# Altium PCB A313_5.PcbDoc (part 2 of 4)
Units mm, origin at the board's own origin, x right, y up, seen from the top; angles counter-clockwise.
Board outline 230.01 x 157.01 mm, 2 copper layers (Top Layer, Bottom Layer); 173 components, 153 nets, 1229 pads, 884 vias.
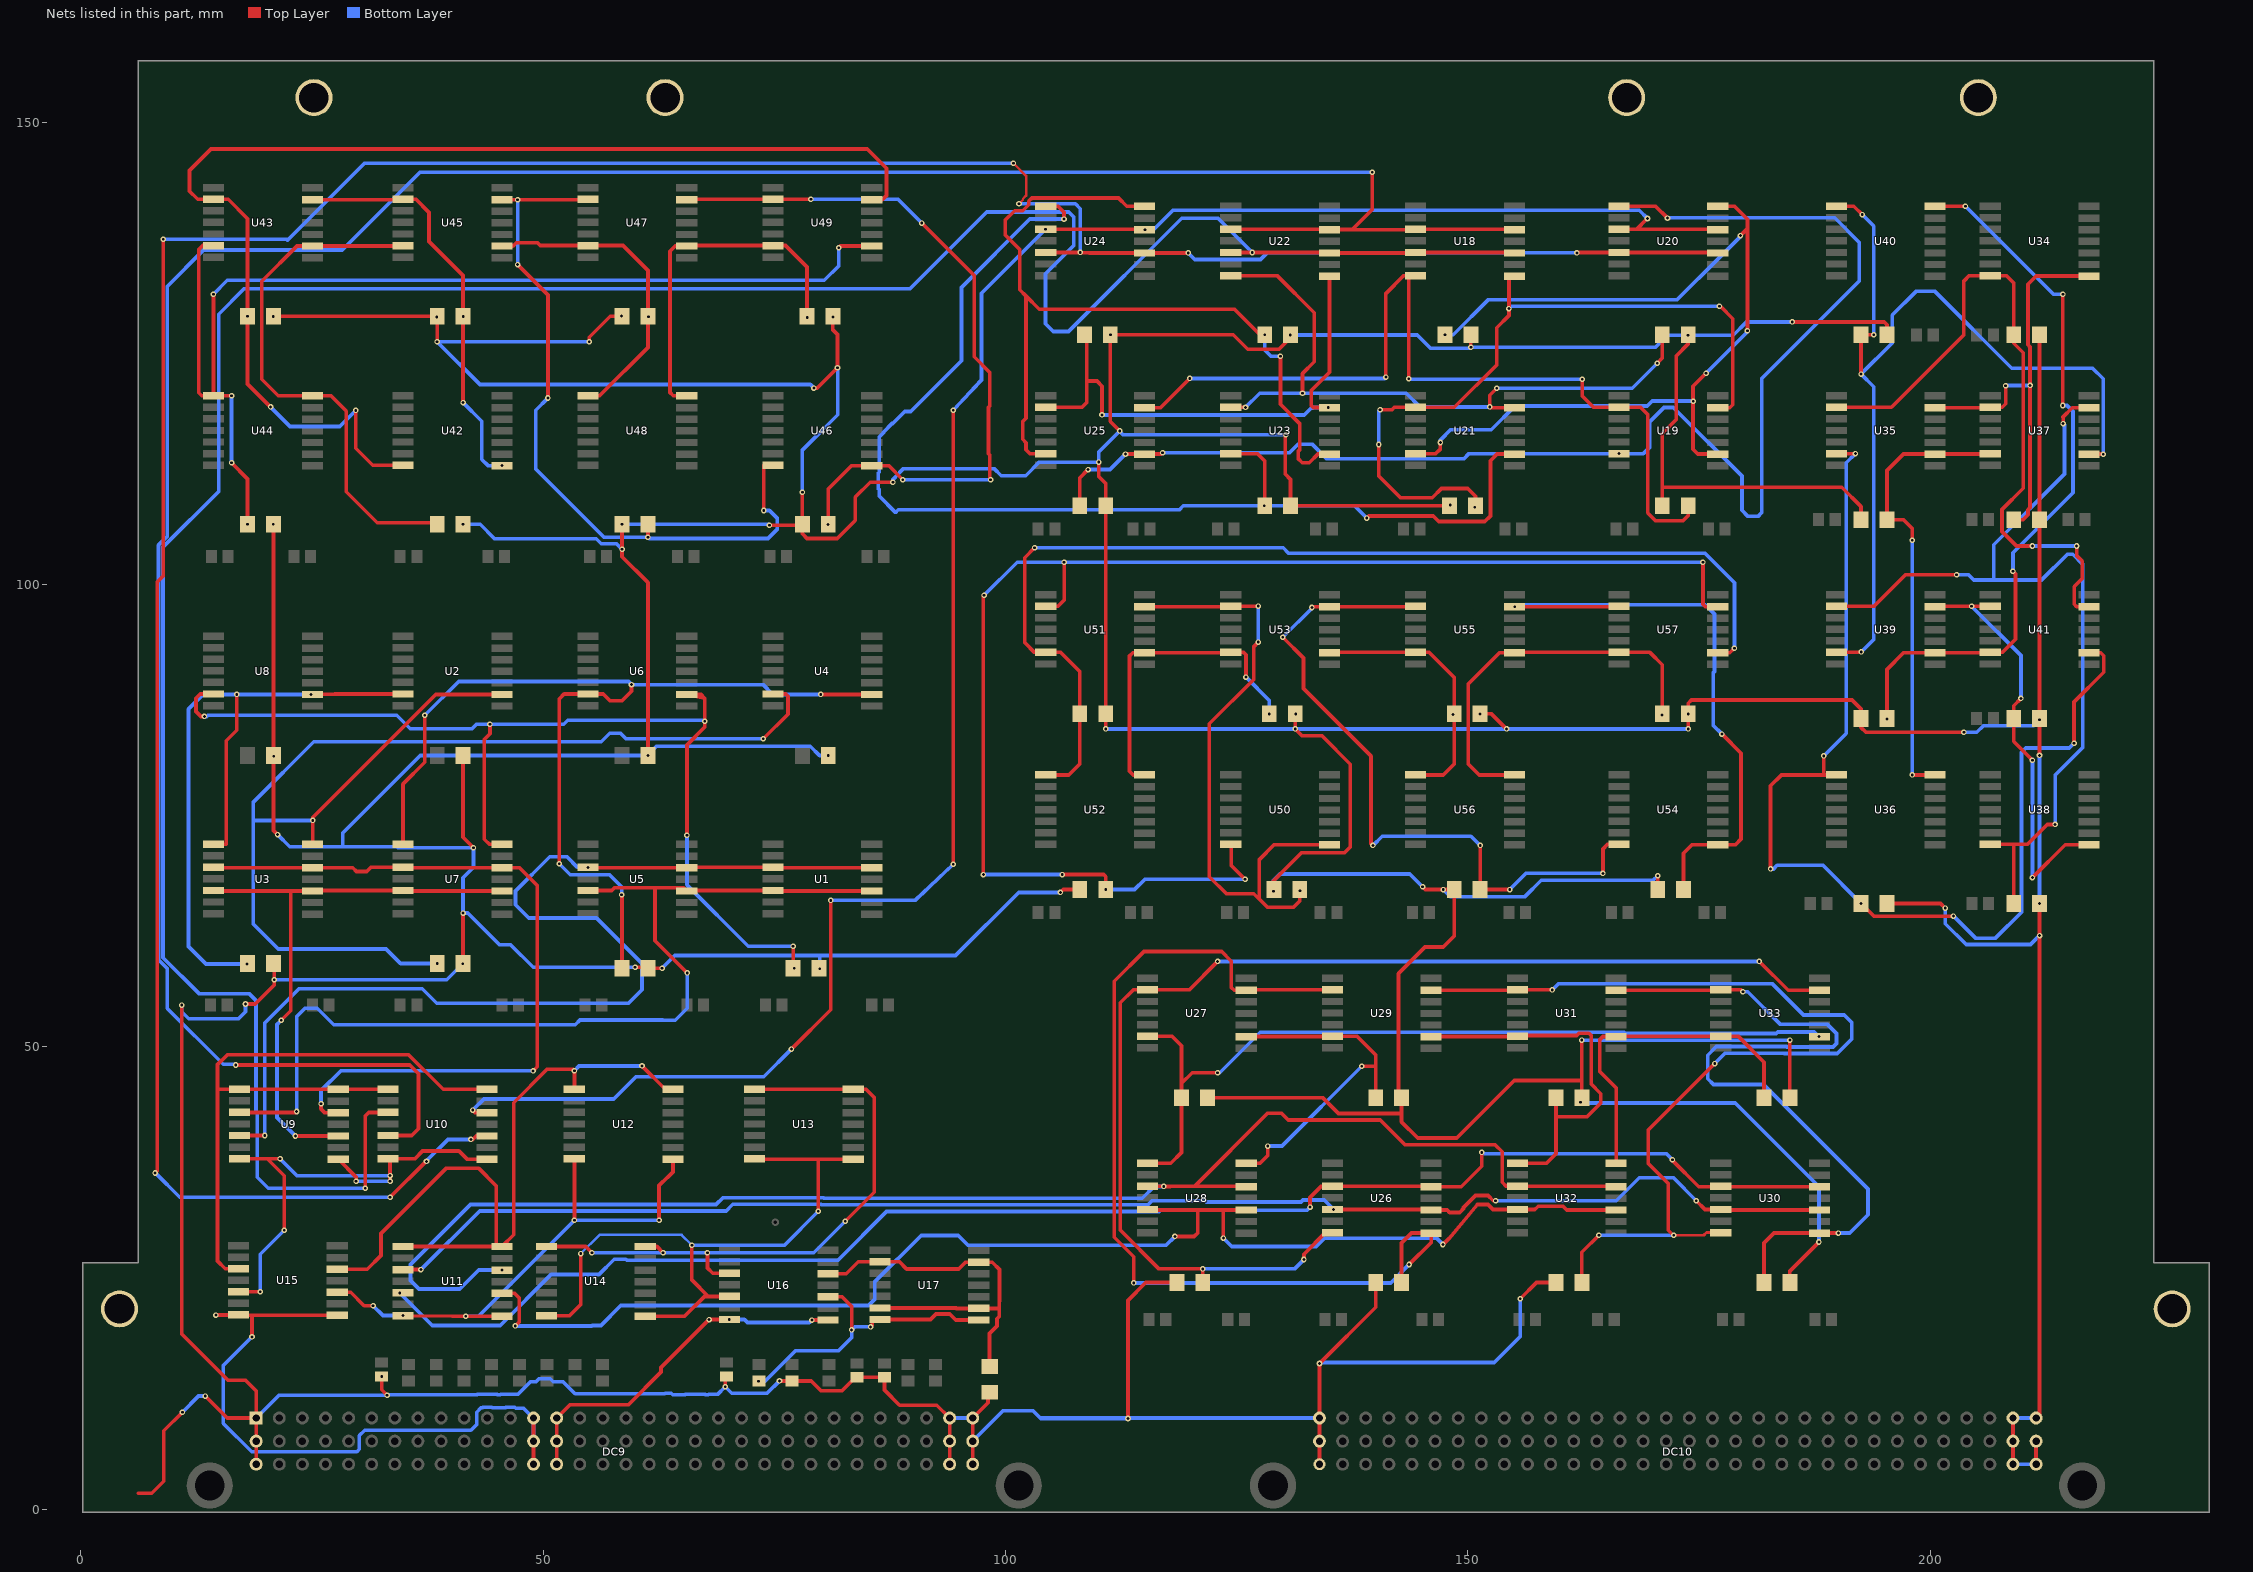
[diagram p2: the nets of this part, all layers, seen from the top]

## Via types
v1: diameter 0.6, hole 0.3, Top Layer to Bottom Layer, 884 vias

## Nets (pads, with @x,y where several pads share a name; then routed paths per layer and width w, separated by ;. In a path a pad name is that pad's centre, name@x,y a point inside that pad or via, vN(x,y) a via of type N, cw(c..) or ccw(c..) an arc to the next point about the centre after c; other vN are vias at no path point) (continued)
NetC5_2: C5.2 U2.6 U3.1 U8.9 | length 74.7
  Top Layer w0.4: U3.1@14.35,71.9 15.706,71.9 15.706,83.097 16.849,84.24 v1(16.849,88.106) ; v1(17.975,58.95) C5.2@18.025,59 ; U8.9@25.025,88.1 25.064,88.139 26.932,88.139 27.466,88.15 U2.6@34.85,88.15
  Bottom Layer w0.4: v1(17.975,58.95) 13.525,58.95 11.625,60.85 11.625,86.514 13.217,88.106 v1(16.849,88.106) v1(24.875,88.106)
NetC6_2: C6.2 U2.9 U3.14 U4.6 | length 136.2
  Top Layer w0.4: U3.14@25.155,71.9 U3.14@25.025,71.9 ; U2.9@45.525,88.1 38.382,88.1 25.075,74.793 v1(25.075,74.475) U3.14@25.075,71.95 ; v1(73.796,83.306) 76.463,85.973 76.463,87.896 76.209,88.15 U4.6@74.85,88.15 ; U3.14@25.025,71.9 U3.14@25.075,71.95 ; U3.14@25.025,71.9 U3.14@25.075,71.95
  Bottom Layer w0.4: v1(25.075,74.475) 18.653,74.475 ; v1(38.525,59) 34.573,59 33,60.573 21.332,60.573 18.653,63.252 18.653,74.475 ; v1(73.796,83.306) 58.946,83.306 58.348,83.904 57.191,83.904 56.279,82.992 25.167,82.992 18.653,76.478 18.653,74.475
NetC7_2: C7.2 U4.9 U6.6 U7.1 | length 109.4
  Top Layer w0.4: U7.1@34.85,71.9 34.832,71.9 34.832,78.404 37.195,80.766 v1(37.195,85.846) ; v1(51.723,69.793) 51.723,87.617 52.257,88.15 56.495,88.15 57.22,87.425 58.525,87.425 59.547,88.447 v1(59.547,89.166) ; v1(58.475,66.45) 58.49,66.45 58.525,66.485 C7.2@58.525,58.5 ; v1(80.003,88.1) U4.9@85.525,88.1
  Bottom Layer w0.4: v1(37.195,85.846) 40.852,89.503 59.209,89.503 v1(59.547,89.166) 73.766,89.166 74.832,88.1 v1(80.003,88.1) ; v1(51.723,69.793) 52.908,68.608 57.176,68.608 58.475,67.309 v1(58.475,66.45)
NetC8_2: C8.2 U6.9 U7.14 U8.6 | length 116.4
  Top Layer w0.4: v1(13.35,85.725) 12.975,85.725 12.45,86.25 12.45,87.7 12.9,88.15 U8.6@14.35,88.15 ; v1(44.23,84.874) 44.23,83.839 43.625,83.234 43.625,72.45 44.175,71.9 U7.14@45.525,71.9 ; v1(65.541,72.866) 65.541,82.645 67.471,84.576 v1(67.471,85.211) 67.471,87.7 ; C8.2@77.025,58.5 v1(77.025,60.878) ; 67.471,87.7 U6.9@65.525,88.1 67.071,88.1 67.471,87.7
  Bottom Layer w0.4: v1(13.35,85.725) 13.579,85.725 13.708,85.854 34.153,85.854 35.615,84.392 42.294,84.392 42.776,84.874 v1(44.23,84.874) 52.227,84.874 52.657,85.304 67.378,85.304 v1(67.471,85.211) ; v1(65.541,72.866) 65.541,67.507 72.17,60.878 v1(77.025,60.878)
  other v1: 77.15,58.5
NetC9_2: C9.2 U18.7 U19.2 U25.13 | length 96.9
  Top Layer w0.4: U25.13@115.025,119.1 116.753,119.1 v1(119.93,122.277) ; v1(141.131,122.422) 141.131,131.47 143.062,133.4 U18.7@143.595,133.4 ; v1(143.595,122.244) U18.7@143.595,133.4 ; U18.7@144.35,133.4 U18.7@143.595,133.4 ; v1(162.366,122.19) 162.366,120.369 163.585,119.15 U19.2@166.35,119.15 168.665,119.15 169.444,118.371 169.444,107.739 170.283,106.9 173.26,106.9 173.825,107.465 C9.2@173.825,108.5
  Bottom Layer w0.4: v1(119.93,122.277) 140.987,122.277 v1(141.131,122.422) ; v1(143.595,122.244) 143.641,122.244 143.695,122.19 v1(162.366,122.19)
NetC10_2: C10.2 U21.13 U22.7 U23.2 | length 76
  Top Layer w0.4: U23.2@124.35,119.15 v1(125.947,119.15) ; U22.7@124.35,133.4 129.367,133.4 133.387,129.38 133.387,124.073 132.114,122.8 v1(132.114,120.68) ; v1(153.12,121.228) 152.358,120.466 v1(152.358,119.196) 152.454,119.1 U21.13@155.025,119.1 ; v1(170.468,123.92) 171.025,124.477 C10.2@171.025,127
  Bottom Layer w0.4: v1(125.947,119.15) 127.477,120.68 v1(132.114,120.68) 143.327,120.68 144.811,119.196 v1(152.358,119.196) ; v1(153.12,121.228) 167.776,121.228 v1(170.468,123.92)
NetC11_2: C11.2 U18.8 U19.13 U21.2 | length 81.8
  Top Layer w0.4: v1(140.369,115.132) 140.369,111.722 142.717,109.374 146.143,109.374 147.151,110.382 149.987,110.382 150.825,109.544 C11.2@150.825,108.5 ; v1(140.5,118.9) 141.791,118.9 142.041,119.15 U21.2@144.35,119.15 148.528,119.15 153.12,123.743 153.12,127.77 154.441,129.091 v1(154.441,129.839) 154.441,133.35 U18.8@155.025,133.35 ; U19.13@177.025,119.1 178.317,119.1 178.647,119.43 178.647,128.746 177.319,130.075 v1(177.2,130.075)
  Bottom Layer w0.4: v1(140.369,115.132) 140.369,118.769 v1(140.5,118.9) ; v1(154.441,129.839) 154.677,130.075 v1(177.2,130.075)
  other v1: 150.75,108.35
NetC12_2: C12.2 U19.6 U20.1 U25.9 | length 151.3
  Top Layer w0.4: C12.2@108.025,108.5 108.025,111.525 v1(108.925,112.425) ; v1(112.971,114.1) 116.849,114.1 v1(116.981,114.232) ; U20.1@166.35,140.9 170.304,140.9 v1(171.586,139.618)
  Bottom Layer w0.4: v1(108.925,112.425) 111.296,112.425 v1(112.971,114.1) ; v1(116.981,114.232) 130.72,114.232 131.663,115.175 133.148,115.175 134.745,113.578 149.54,113.578 150.112,114.15 v1(166.35,114.15) 168.978,114.15 169.681,114.853 169.681,117.613 171.205,119.137 172.221,119.137 179.638,111.72 179.638,108.02 180.298,107.36 181.365,107.36 181.771,107.766 181.771,122.265 192.329,132.822 192.329,136.985 189.665,139.649 171.618,139.649 v1(171.586,139.618)
NetC13_2: C13.2 U22.8 U23.13 U25.2 | length 58.7
  Top Layer w0.4: U25.2@104.35,119.15 108.268,119.15 108.764,119.646 108.764,121.99 ; C13.2@108.525,127 108.764,126.761 108.764,121.99 ; v1(110.429,118.332) 110.429,121.446 109.879,121.996 108.77,121.996 108.764,121.99 ; v1(134.889,119.136) 133.273,119.136 133.075,119.334 133.075,120.995 135.035,122.955 135.035,133.35 U22.8@135.025,133.35
  Bottom Layer w0.4: v1(110.429,118.332) 132.312,118.332 133.13,119.15 133.23,119.05 133.315,119.136 v1(134.889,119.136)
NetC14_2: C14.2 U23.9 U24.14 U25.6 | length 92.2
  Top Layer w0.4: U25.6@104.35,114.15 102.625,114.15 102.215,114.56 102.215,115.327 101.853,115.689 101.853,117.611 102.215,117.973 102.215,131.188 ; U24.14@115.025,140.9 113.115,140.9 112.213,141.802 102.857,141.802 102.51,141.455 102.51,141.06 101.863,140.413 100.982,140.413 99.977,139.408 99.977,137.777 101.525,136.23 101.525,131.878 102.215,131.188 ; v1(128.025,127) 127.517,127 124.755,129.762 103.641,129.762 102.215,131.188 ; v1(129.725,124.675) 129.725,119.477 131.8,117.402 131.8,114.538 131.64,114.378 131.64,113.608 132.089,113.159 132.834,113.159 133.775,114.1 U23.9@135.025,114.1
  Bottom Layer w0.4: v1(128.025,127) 128.025,125.35 128.7,124.675 v1(129.725,124.675)
NetC15_2: C15.2 U19.9 U20.14 U21.6 | length 104.5
  Top Layer w0.4: U21.6@144.35,114.15 146.525,114.15 147.025,114.65 v1(147.025,115.35) ; v1(175.764,122.848) 174.345,121.429 174.345,114.624 174.869,114.1 U19.9@177.025,114.1 ; U20.14@177.025,140.9 178.825,140.9 180.232,139.493 180.232,138.482 ; v1(179.475,137.725) 180.232,138.482 ; v1(180.232,127.424) 180.232,138.482
  Bottom Layer w0.4: v1(147.025,115.35) 147.025,115.622 148.124,116.721 152.525,116.721 155.101,119.298 169.389,119.298 169.929,119.837 174.338,119.837 v1(174.375,119.8) ; v1(147.525,127) 148.421,127 152.225,130.804 172.654,130.804 177.112,135.263 179.475,137.625 v1(179.475,137.725) ; v1(175.764,122.848) 180.232,127.317 v1(180.232,127.424)
NetC16_2: C16.2 U21.9 U23.6 U24.1 | length 129.9
  Top Layer w0.4: U24.1@104.35,140.9 105.673,140.9 106.321,140.252 v1(106.321,139.516) ; U23.6@124.35,114.15 127.22,114.15 128.025,113.345 C16.2@128.025,108.5 v1(127.975,108.5) ; v1@139.05,107.182 139.268,107.4 146.25,107.4 146.85,106.8 151.825,106.8 152.434,107.409 152.434,113.378 153.156,114.1 U21.9@155.025,114.1
  Bottom Layer w0.4: v1(106.321,139.516) 102.618,139.516 95.225,132.123 95.225,124.18 89.745,118.701 89.086,118.701 87.79,117.405 87.726,117.405 86.788,116.468 86.788,116.403 86.329,115.944 86.329,112.122 86.217,112.01 86.217,110.38 86.329,110.268 86.329,109.598 86.329,109.568 88.105,107.791 88.392,108.079 118.804,108.079 119.225,108.5 v1(127.975,108.5) 137.725,108.5 v1(139.05,107.175)
NetC17_2: C17.2 U26.7 U27.2 U33.13 | length 131.5
  Top Layer w0.4: C17.2@121.325,24.5 v1(121.325,25.978) 116.603,25.978 112.401,30.181 112.401,54.75 113.801,56.15 119.852,56.15 v1(122.929,59.227) ; v1(132.267,26.994) 132.267,27.563 134.604,29.9 U26.7@135.35,29.9 ; v1(181.517,59.227) 184.644,56.1 U33.13@188.025,56.1
  Bottom Layer w0.4: v1(121.325,25.978) 131.251,25.978 v1(132.267,26.994) ; v1(122.929,59.227) v1(181.517,59.227)
NetC18_2: C18.2 U29.13 U30.7 U31.2 | length 107.1
  Top Layer w0.3: v1(172.272,29.61) 175.51,29.61 175.8,29.9 U30.7@177.35,29.9
  Top Layer w0.4: U29.13@146.025,56.1 155.3,56.1 U31.2@155.35,56.15 v1(159.115,56.15) ; C18.2@162.325,24.5 162.325,27.766 v1(164.169,29.61) ; v1@172.221,29.604 171.675,30.15 171.675,35.211 169.503,37.383 169.503,40.989 v1(176.691,48.178)
  Bottom Layer w0.4: v1(159.115,56.15) 159.764,56.799 182.933,56.799 186.298,53.434 190.714,53.434 191.525,52.623 191.525,50.834 189.955,49.264 184.223,49.264 184.191,49.295 177.809,49.295 v1(176.691,48.178) ; v1(164.169,29.61) v1(172.272,29.61)
NetC19_2: C19.2 U26.8 U27.13 U29.2 | length 104.8
  Top Layer w0.4: v1(113.852,24.454) 113.852,27.284 111.747,29.389 111.747,57.078 114.962,60.293 123.377,60.293 124.418,59.252 124.418,56.405 124.723,56.1 U27.13@126.025,56.1 126.075,56.15 U29.2@135.35,56.15 ; C19.2@142.825,24.5 142.825,28.772 143.903,29.85 U26.8@146.025,29.85 146.025,28.834 v1(143.64,26.449)
  Bottom Layer w0.4: v1(113.852,24.454) 141.645,24.454 v1(143.64,26.449)
NetC20_2: C20.2 U27.6 U28.1 U33.9 | length 91.4
  Top Layer w0.4: U28.1@115.35,37.4 117.865,37.4 119.025,38.56 C20.2@119.025,44.5 119.025,46.044 ; U27.6@115.35,51.15 117.983,51.15 119.025,50.108 119.025,46.044 ; v1(122.925,47.2) 120.181,47.2 119.025,46.044
  Bottom Layer w0.4: v1(122.925,47.2) 123.161,47.2 127.542,51.581 166.888,51.581 167.032,51.437 183.346,51.437 183.509,51.6 187.469,51.6 v1(187.969,51.1)
NetC21_2: C21.2 U30.8 U31.13 U33.2 | length 85.8
  Top Layer w0.4: U31.13@166.025,56.1 177.3,56.1 U33.2@177.35,56.15 179.55,56.15 v1(179.75,55.95) ; C21.2@182.025,24.5 182.025,28.772 183.103,29.85 v1(190.075,29.85)
  Bottom Layer w0.4: v1(179.75,55.95) 180.265,55.95 183.765,52.45 188.85,52.45 189.875,51.425 189.875,50.346 189.493,49.964 184.513,49.964 184.459,50.018 176.855,50.018 175.929,49.092 175.929,46.552 176.564,45.917 181.975,45.917 193.278,34.614 193.278,31.82 191.308,29.85 v1(190.075,29.85)
NetC22_2: C22.2 U31.9 U32.14 U33.6 | length 37.1
  Top Layer w0.4: U32.14@166.025,37.4 166.049,37.4 166.049,45.536 164.245,47.339 164.245,50.744 164.601,51.1 U31.9@166.025,51.1 166.075,51.15 U33.6@177.35,51.15 179.206,51.15 182.025,48.331 C22.2@182.025,44.5
NetC23_2: C23.2 U27.9 U28.14 U29.6 | length 38.4
  Top Layer w0.4: U28.14@126.025,37.4 127.517,37.4 128.363,38.246 v1(128.363,39.262) ; U27.9@126.025,51.1 135.3,51.1 U29.6@135.35,51.15 137.981,51.15 140.025,49.106 140.025,47.9 ; v1(138.515,47.89) 140.015,47.89 140.025,47.9 ; C23.2@140.025,44.5 140.025,47.9
  Bottom Layer w0.4: v1(128.363,39.262) 129.887,39.262 v1(138.515,47.89)
NetC24_2: C24.2 U29.9 U31.6 U32.1 | length 41.5
  Top Layer w0.4: U29.9@146.025,51.1 155.3,51.1 U31.6@155.35,51.15 156.092,51.15 156.168,51.226 161.767,51.226 162.013,51.472 163.085,51.472 163.331,51.226 163.331,45.968 164.372,44.926 164.372,43.91 162.907,42.445 159.57,42.445 159.525,42.4 ; U32.1@155.35,37.4 158.505,37.4 159.525,38.42 159.525,42.4 ; C24.2@159.525,44.5 159.525,42.4
NetC25_2: C25.2 U50.7 U51.2 U57.13 | length 156.8
  Top Layer w0.4: v1(97.6,68.625) 97.6,98.753 v1(97.672,98.825) ; U51.2@104.35,97.65 105.673,97.65 106.333,98.31 v1(106.333,102.407) ; v1(106.125,68.625) 110.6,68.625 110.825,68.4 v1(110.825,67) ; U50.7@124.35,71.9 124.418,71.832 124.418,69.607 v1(125.9,68.125) ; v1(175.421,102.407) 175.421,97.86 175.681,97.6 U57.13@177.025,97.6
  Bottom Layer w0.4: v1(97.6,68.625) v1(106.125,68.625) ; v1(97.672,98.825) 101.253,102.407 v1(106.333,102.407) v1(175.421,102.407) ; v1(110.825,67) 113.954,67 115.079,68.125 v1(125.9,68.125)
NetC26_2: C26.2 U53.13 U54.7 U55.2 | length 78.2
  Top Layer w0.4: v1(129.981,94.279) 132.216,92.043 132.216,88.741 139.523,81.434 139.523,71.985 v1(139.734,71.774) ; v1(133.13,97.504) 133.226,97.6 U53.13@135.025,97.6 144.3,97.6 U55.2@144.35,97.65 ; v1(151.325,71.774) C26.2@151.325,67 v1(154.518,67) ; v1(164.601,68.752) 164.601,71.392 165.109,71.9 U54.7@166.35,71.9
  Bottom Layer w0.4: v1(129.981,94.279) 133.13,97.428 v1(133.13,97.504) ; v1(139.734,71.774) 140.736,72.776 150.323,72.776 v1(151.325,71.774) ; v1(154.518,67) 156.27,68.752 v1(164.601,68.752)
NetC27_2: C27.2 U50.8 U51.13 U53.2 | length 69
  Top Layer w0.4: U51.13@115.025,97.6 124.3,97.6 U53.2@124.35,97.65 127.332,97.65 v1(127.339,97.657) ; v1(127.339,93.771) 126.857,93.288 126.857,89.757 122.031,84.931 122.031,68.396 123.885,66.542 126.85,66.542 127.45,65.942 ; C27.2@131.825,67 131.825,65.75 131.15,65.075 128.317,65.075 127.45,65.942 ; U50.8@135.025,71.85 129.041,71.85 127.45,70.259 127.45,65.942
  Bottom Layer w0.4: v1(127.339,93.771) v1(127.339,97.657)
  other v1: 131.85,66.872
NetC28_2: C28.2 U51.6 U52.1 U57.9 | length 118.4
  Top Layer w0.4: v1(103.133,103.956) 102.074,102.897 102.074,93.709 103.133,92.65 105.955,92.65 108.025,90.58 C28.2@108.025,86 108.025,80.588 106.837,79.4 U52.1@104.35,79.4 ; U57.9@177.025,92.6 178.317,92.6 v1(178.825,93.108)
  Bottom Layer w0.4: v1(103.133,103.956) 130.025,103.956 130.606,103.375 175.641,103.375 178.825,100.191 v1(178.825,93.108)
NetC29_2: C29.2 U54.8 U55.13 U57.2 | length 69.9
  Top Layer w0.4: U55.13@155.025,97.6 166.3,97.6 U57.2@166.35,97.65 ; C29.2@173.325,67 173.325,70.936 174.239,71.85 178.934,71.85 179.544,72.46 179.544,81.748 v1(177.479,83.814)
  Bottom Layer w0.4: v1(155.076,97.575) 155.31,97.809 167.189,97.809 167.197,97.801 175.672,97.801 175.68,97.809 176.676,96.813 176.676,90.58 176.52,90.425 176.52,84.773 v1(177.479,83.814)
NetC30_2: C30.2 U55.9 U56.14 U57.6 | length 42.4
  Top Layer w0.4: U56.14@155.025,79.4 151.235,79.4 150.047,80.588 150.047,89.222 153.425,92.6 U55.9@155.025,92.6 155.075,92.65 U57.6@166.35,92.65 169.681,92.65 171.025,91.306 C30.2@171.025,86
  other v1: 171,85.875
NetC31_2: C31.2 U51.9 U52.14 U53.6 | length 34.5
  Top Layer w0.4: U52.14@115.025,79.4 113.801,79.4 113.4,79.801 113.4,92.252 113.748,92.6 U51.9@115.025,92.6 124.3,92.6 U53.6@124.35,92.65 125.739,92.65 125.993,92.396 v1(125.993,89.986)
  Bottom Layer w0.4: v1(125.993,89.986) 128.525,87.454 v1(128.525,86)
NetC32_2: C32.2 U53.9 U55.6 U56.1 | length 28.7
  Top Layer w0.4: U53.9@135.025,92.6 135.075,92.65 U55.6@144.35,92.65 145.808,92.65 148.525,89.933 C32.2@148.525,86 148.525,80.588 147.337,79.4 U56.1@144.35,79.4
  other v1: 148.4,85.948
NetC33_2: C33.2 U34.7 U35.2 U41.13 | length 74.4
  Top Layer w0.4: U35.2@189.85,119.15 195.8,119.15 203.641,126.991 203.641,132.816 204.225,133.4 U34.7@206.496,133.4 208.225,133.4 209.025,132.6 C33.2@209.025,127 209.025,126.08 210.05,125.055 210.05,121.841 210.046,121.837 210.046,121.213 210.05,121.209 210.05,110.391 207.756,108.096 207.756,105.734 209.33,104.159 v1(211.058,104.159) ; v1(215.833,104.159) 215.833,103.132 216.442,102.522 216.442,100.633 215.574,99.765 215.574,97.86 215.834,97.6 U41.13@217.171,97.6
  Bottom Layer w0.4: v1(211.058,104.159) v1(215.833,104.159)
NetC34_2: C34.2 U37.13 U38.7 U39.2 | length 97.5
  Top Layer w0.4: U39.2@189.85,97.65 193.931,97.65 197.331,101.049 v1(202.853,101.049) ; U38.7@206.496,71.9 209.025,71.9 ; C34.2@209.025,65.5 209.025,71.9 ; v1(213.509,74.047) 212.67,74.047 210.523,71.9 209.025,71.9 ; v1(214.375,117.4) 214.375,118.088 214.36,118.104 215.356,119.1 U37.13@217.171,119.1
  Bottom Layer w0.4: v1(202.853,101.049) 204.134,101.049 204.707,100.477 212.049,100.477 214.842,103.27 215.415,103.27 216.48,102.205 216.48,82.339 213.509,79.367 v1(213.509,74.047) ; 206.875,100.623 206.87,100.628 206.87,104.3 214.514,111.944 214.514,117.261 v1(214.375,117.4)
NetC35_2: C35.2 U34.8 U35.13 U37.2 | length 46.3
  Top Layer w0.4: U35.13@200.525,119.1 206.446,119.1 U37.2@206.496,119.15 207.793,119.15 208.175,119.532 208.175,121.475 v1(208.15,121.5) ; C35.2@209.025,107 210.038,107 210.571,107.533 210.571,108.088 210.8,108.317 v1(210.8,121.525) 210.8,125.683 210.571,125.912 210.571,132.414 210.55,132.436 211.464,133.35 U34.8@217.171,133.35
  Bottom Layer w0.4: v1(208.15,121.5) 208.175,121.525 v1(210.8,121.525)
NetC36_2: C36.2 U35.6 U36.1 U41.9 | length 122.4
  Top Layer w0.4: v1(182.737,69.234) 182.737,78.225 183.912,79.4 188.477,79.4 ; v1(188.477,81.452) 188.477,79.4 ; U36.1@189.85,79.4 188.477,79.4 ; U35.6@189.85,114.15 v1(191.906,114.15) ; v1(192.525,65.5) 193.896,64.129 v1(202.506,64.129) ; v1(215.553,82.823) 215.553,87.279 218.768,90.494 218.768,92.281 218.449,92.6 U41.9@217.171,92.6
  Bottom Layer w0.4: v1(182.737,69.234) 183.056,69.234 183.443,69.621 188.404,69.621 v1(192.525,65.5) ; v1(188.477,81.452) 190.915,83.89 190.915,113.159 v1(191.906,114.15) ; v1(202.506,64.129) 204.885,61.75 207.058,61.75 209.864,64.556 209.864,81.858 210.321,82.315 215.045,82.315 v1(215.553,82.823)
NetC37_2: C37.2 U38.8 U39.13 U41.2 | length 46.3
  Top Layer w0.4: U39.13@200.525,97.6 200.575,97.65 v1(204.479,97.65) U41.2@206.496,97.65 ; v1(209.813,87.675) 209.025,86.887 C37.2@209.025,85.5 209.025,83.027 v1(211.058,80.994) ; v1(211.058,68.294) 214.613,71.85 U38.8@217.171,71.85
  Bottom Layer w0.4: v1(204.479,97.65) 209.813,92.316 v1(209.813,87.675) ; v1(211.058,68.294) v1(211.058,80.994)
NetC38_2: C38.2 U39.9 U40.14 U41.6 | length 79.2
  Top Layer w0.4: C38.2@195.325,85.5 195.325,90.812 197.113,92.6 U39.9@200.525,92.6 206.207,92.6 206.207,92.65 U41.6@206.496,92.65 207.803,92.65 209.225,94.072 209.225,101.14 v1(208.949,101.416) ; U40.14@200.525,140.9 v1(203.806,140.9) ; v1(214.325,119.35) 214.325,131.355 v1(214.35,131.38)
  Bottom Layer w0.4: v1(203.806,140.9) 213.326,131.38 v1(214.35,131.38) ; v1(208.949,101.416) 208.949,103.423 215.45,109.923 215.45,118.7 214.8,119.35 v1(214.325,119.35)
  other v1: 195.325,85.45
NetC39_2: C39.2 U35.9 U36.14 U37.6 | length 49.5
  Top Layer w0.4: v1(198.053,79.4) U36.14@200.525,79.4 ; v1(198.053,104.769) 198.053,106.06 197.113,107 C39.2@195.325,107 195.325,112.312 197.113,114.1 U35.9@200.525,114.1 206.446,114.1 U37.6@206.496,114.15
  Bottom Layer w0.4: v1(198.053,79.4) v1(198.053,104.769)
NetC40_2: C40.2 U37.9 U39.6 U40.1 | length 101.4
  Top Layer w0.4: U39.6@189.85,92.65 192.487,92.65 v1(192.541,92.704) ; U40.1@189.85,140.9 191.741,140.9 v1(192.643,139.999) ; v1(192.525,122.752) C40.2@192.525,127 v1(193.887,127) ; U37.9@217.171,114.1 218.694,114.1 v1(218.703,114.091)
  Bottom Layer w0.4: v1(192.541,92.704) 193.887,94.05 193.887,121.39 v1(192.525,122.752) 195.894,126.121 195.894,129.127 198.459,131.693 200.517,131.693 208.822,123.387 217.56,123.387 218.703,122.244 v1(218.703,114.091) ; v1(192.643,139.999) 193.887,138.754 v1(193.887,127)
NetC41_2: C41.2 U42.7 U43.2 U49.13 | length 133.9
  Top Layer w0.4: v1(20.507,119.196) 18.025,121.678 v1(18.025,129) 18.025,139.56 15.935,141.65 12.625,141.65 11.75,142.525 11.75,144.775 14.075,147.1 85.05,147.1 87.131,145.019 87.131,142.055 86.676,141.6 U49.13@85.525,141.6 ; v1(29.727,118.815) 29.727,114.726 31.553,112.9 U42.7@34.85,112.9
  Bottom Layer w0.4: v1(20.507,119.196) 22.615,117.088 28,117.088 v1(29.727,118.815)
NetC42_2: C42.2 U45.13 U46.7 U47.2 | length 80.3
  Top Layer w0.4: U45.13@45.525,141.6 v1(47.228,141.6) 54.8,141.6 U47.2@54.85,141.65 ; v1(47.228,134.588) 50.504,131.312 v1(50.504,120.161) ; v1(61.325,105.099) C42.2@61.325,106.5 ; v1(73.855,107.995) 73.855,112.9 U46.7@74.85,112.9
  Bottom Layer w0.4: v1(47.228,134.588) v1(47.228,141.6) ; v1(50.504,120.161) 49.183,118.84 49.183,112.49 56.575,105.099 v1(61.325,105.099) 61.452,104.972 74.304,104.972 75.32,105.988 75.32,107.131 74.456,107.995 v1(73.855,107.995)
NetC43_2: C43.2 U42.8 U43.13 U45.2 | length 44.8
  Top Layer w0.4: U43.13@25.025,141.6 34.8,141.6 U45.2@34.85,141.65 36.229,141.65 37.65,140.229 37.65,137.079 41.325,133.404 C43.2@41.325,129 v1(41.325,119.663)
  Bottom Layer w0.4: v1(41.325,119.663) 43.341,117.647 43.341,113.525 44.016,112.85 v1(45.525,112.85)
  other v1: 41.35,128.991
NetC44_2: C44.2 U43.6 U44.1 U49.9 | length 121.1
  Top Layer w0.4: v1(14.335,131.388) U44.1@14.335,120.4 ; U43.6@14.35,136.65 13.17,136.65 12.734,136.214 12.734,120.72 13.054,120.4 U44.1@14.335,120.4 ; v1(16.29,113.151) 18.025,111.416 C44.2@18.025,106.5 ; v1(16.29,120.4) U44.1@14.35,120.4 U44.1@14.335,120.4 ; v1(81.951,136.417) 82.134,136.6 U49.9@85.525,136.6
  Bottom Layer w0.4: v1(14.335,131.388) 15.833,132.887 80.402,132.887 81.951,134.436 v1(81.951,136.417) ; v1(16.29,113.151) v1(16.29,120.4)
  other v1: 18.025,106.516
NetC45_2: C45.2 U46.8 U47.13 U49.2 | length 80.5
  Top Layer w0.4: U47.13@65.525,141.6 65.575,141.65 U49.2@74.85,141.65 v1(78.952,141.65) ; C45.2@80.825,106.5 80.825,110.315 83.36,112.85 U46.8@85.525,112.85 87.356,112.85 v1(88.884,111.322) ; v1(90.933,139.084) 96.6,133.417 96.6,124.622 98.299,122.923 98.299,119.289 98.153,119.143 98.153,114.157 98.299,114.011 98.299,111.406 v1(98.383,111.322)
  Bottom Layer w0.4: v1(78.952,141.65) 88.367,141.65 v1(90.933,139.084) ; v1(88.884,111.322) v1(98.383,111.322)
  other v1: 80.8,106.475
NetC46_2: C46.2 U47.9 U48.14 U49.6 | length 38.6
  Top Layer w0.4: U48.14@65.525,120.4 64.068,120.4 63.7,120.768 63.7,136.029 64.271,136.6 U47.9@65.525,136.6 65.575,136.65 76.209,136.65 78.525,134.334 C46.2@78.525,129
  other v1: 78.55,128.875
NetC47_2: C47.2 U43.9 U44.14 U45.6 | length 58
  Top Layer w0.4: U45.6@34.85,136.65 34.8,136.6 U43.9@25.025,136.6 23.377,136.6 19.567,132.79 19.567,122.178 21.345,120.4 U44.14@25.025,120.4 27.043,120.4 28.7,118.743 28.7,110.031 32.056,106.675 38.35,106.675 C47.2@38.525,106.5
NetC48_2: C48.2 U45.9 U47.6 U48.1 | length 34.2
  Top Layer w0.4: U45.9@45.525,136.6 46.715,136.6 47.069,136.954 49.367,136.954 49.671,136.65 U47.6@54.85,136.65 58.632,136.65 61.325,133.957 C48.2@61.325,129 61.325,125.633 56.092,120.4 U48.1@54.85,120.4
  other v1: 61.375,128.95
NetC49_1: C49.1 U16.12 U17.2 U17.6 U17.9 U17.13 | length 44.4
  Top Layer w0.4: U16.12@80.8,25.45 82.757,25.45 84.057,26.75 88.523,26.75 89.298,25.975 94.941,25.975 95.666,26.7 98.561,26.7 99.351,25.91 99.351,22.49 ; U17.6@86.425,21.75 94.632,21.75 94.682,21.7 99.305,21.7 ; C49.1@97.875,15.225 C49.1@97.875,15.85 ; C49.1@98.266,15.425 98.266,18.994 99.075,19.803 99.075,20.59 99.305,20.82 ; 99.33,20.905 99.33,22.465
NetC52_1: 
NetR57_1: R57.1 U16.10 U17.7 U17.8 | length 33.5
  Top Layer w0.4: U16.10@80.8,22.95 82.336,22.95 83.35,21.936 v1(83.35,19.375) ; v1(85.404,19.704) 85.575,19.875 85.575,20.5 U17.7@86.425,20.5 91.88,20.5 92.473,21.093 93.971,21.093 94.614,20.45 U17.8@97.1,20.45
  Bottom Layer w0.4: v1(73.275,13.825) 73.995,13.825 77.286,17.115 81.94,17.115 83.35,18.525 v1(83.35,19.375) 83.679,19.704 v1(85.404,19.704)
NetU9_1: U9.1 U9.14 U10.1 U10.14 U15.3 | length 73.2
  Top Layer w0.4: 14.993,45.4 U9.1@17.15,45.4 U9.14@27.825,45.4 U10.1@33.225,45.4 ; U15.3@17.05,26 15.608,26 14.775,26.833 14.775,27.948 14.779,27.952 14.779,28.576 14.775,28.58 14.775,48.075 15.843,49.143 35.433,49.143 39.176,45.4 U10.14@43.9,45.4
NetU9_7: U9.7 U9.8 U10.7 U10.8 U15.5 | length 56.3
  Top Layer w0.4: U15.5@17.05,23.5 v1(19.395,23.5) ; U9.7@17.15,37.9 20.142,37.9 ; v1(21.539,37.9) 20.142,37.9 ; v1(21.98,30.144) 21.98,36.062 20.142,37.9 ; U9.8@27.825,37.85 29.76,35.915 v1(29.76,35.462) ; U10.7@33.225,37.9 U10.7@33.435,37.9 ; v1(33.435,35.462) v1(33.435,36.062) U10.7@33.435,37.9 ; U10.8@43.9,37.85 41.75,37.85 40.875,38.725 36.95,38.725 36.125,37.9 U10.7@33.435,37.9
  Bottom Layer w0.4: v1(19.395,23.5) 19.395,27.559 v1(21.98,30.144) ; v1(21.539,37.9) 23.377,36.062 v1(33.435,36.062) ; v1(29.76,35.462) v1(33.435,35.462)
NetU11_1: U11.1 U11.14 U12.1 U12.14 U15.12 | length 79.9
  Top Layer w0.4: U15.12@27.725,25.95 30.969,25.95 32.45,27.431 32.45,29.793 39.531,36.875 42.986,36.875 44.916,34.944 U11.14@44.916,28.4 ; U11.1@34.85,28.4 U11.14@44.916,28.4 ; 53.35,46.044 U12.1@53.35,45.4 53.375,45.425 v1(53.375,47.4) 53.214,47.561 50.411,47.561 46.8,43.949 46.8,29.675 U11.14@45.525,28.4 U11.14@44.916,28.4 ; v1(60.681,47.924) 63.204,45.4 U12.14@64.025,45.4
  Bottom Layer w0.4: v1(53.375,47.4) 53.874,47.924 v1(60.681,47.924)
NetU11_7: U11.7 U11.8 U12.7 U12.8 U15.10 | length 57.8
  Top Layer w0.4: U15.10@27.725,23.45 29.168,23.45 30.628,21.99 v1(31.6,21.99) ; U11.7@34.85,20.9 40.191,20.85 v1(41.614,20.85) U11.8@45.525,20.85 ; U12.7@53.35,37.9 53.374,37.9 v1(53.374,31.236) ; v1(62.525,31.231) 62.525,34.984 63.464,35.924 63.498,35.924 64.025,36.45 U12.8@64.025,37.85
  Bottom Layer w0.4: v1(31.6,21.99) 32.665,20.925 v1(34.825,20.925) ; v1(41.614,20.85) 42.989,20.85 v1(53.374,31.236) ; v1@53.574,31.231 v1(62.525,31.231)
NetU13_1: U13.1 U13.14 U14.1 U14.14 U16.3 | length 68.4
  Top Layer w0.4: U14.1@50.35,28.4 54.594,28.4 v1(55.263,27.731) ; U14.14@61.025,28.4 62.289,28.4 v1(62.958,27.731) ; v1(67.76,27.731) 67.76,26.075 68.335,25.5 U16.3@70.125,25.5 ; U13.1@72.85,45.4 U13.14@83.525,45.4 84.905,45.4 85.785,44.52 85.785,34.258 v1(82.661,31.134)
  Bottom Layer w0.4: v1(55.263,27.731) v1(62.958,27.731) v1(67.76,27.731) 79.257,27.731 v1(82.661,31.134)
NetU13_7: U13.7 U13.8 U14.7 U14.8 U16.5 | length 70.9
  Top Layer w0.4: U14.7@50.35,20.9 52.84,20.9 54.059,22.119 v1(54.059,27.628) ; U14.8@61.025,20.85 65.29,20.85 67.44,23 67.846,23 ; v1(66.074,28.543) 66.074,24.771 67.846,23 ; U16.5@70.125,23 67.846,23 ; U13.7@72.85,37.9 72.9,37.85 79.575,37.85 ; v1(79.74,32.201) 79.74,37.685 79.575,37.85 ; U13.8@83.525,37.85 79.575,37.85
  Bottom Layer w0.254: v1(54.059,27.628) 56.081,29.65 64.968,29.65 v1(66.074,28.543)
  Bottom Layer w0.4: v1(66.074,28.543) 76.082,28.543 v1(79.74,32.201)
obs.prov: C1.1 C2.1 C3.1 C4.1 C5.1 C6.1 C7.1 C8.1 C9.1 C10.1 C11.1 C12.1 C13.1 C14.1 C15.1 C16.1 C17.1 C18.1 C19.1 C20.1 C21.1 C22.1 C23.1 C24.1 C25.1 C26.1 C27.1 C28.1 C29.1 C30.1 C31.1 C32.1 C33.1 C34.1 C35.1 C36.1 C37.1 C38.1 C39.1 C40.1 C41.1 C42.1 C43.1 C44.1 C45.1 C46.1 C47.1 C48.1 C49.2 C50.2 C51.2 C52.2 C53.2 DC9.A1 DC9.A31 DC9.A32 DC9.B1 DC9.B31 DC9.B32 DC9.C1 DC9.C31 DC9.C32 DC10.A1 DC10.A31 DC10.A32 DC10.B1 DC10.B31 DC10.B32 DC10.C1 DC10.C31 DC10.C32 pad.ck R58.1 | length 1472.7
  Top Layer w0.4: 6.225,1.7 7.65,1.7 8.962,3.013 8.962,8.463 v1(10.975,10.475) ; v1(10.906,54.502) 10.906,18.923 15.898,13.93 17.789,13.93 18.95,12.769 DC9.C1@18.95,9.85 ; v1(13.45,12.225) 15.825,9.85 DC9.C1@18.95,9.85 ; v1(17.8,54.625) 18.852,54.625 20.9,56.673 v1(20.9,57.25) 20.9,58.925 C5.1@20.825,59 ; DC9.A1@18.95,4.85 DC9.C1@18.95,9.85 ; C44.1@20.825,106.5 C1.1@20.825,81.5 20.825,73.386 v1(21.269,72.943) ; C41.1@20.825,129 C43.1@38.525,129 38.525,126.267 v1(38.515,126.257) ; v1(32.525,14.35) 32.525,12.893 v1(33.105,12.313) ; v1(41.3,58.975) C6.1@41.325,59 v1(41.325,64.459) ; C2.1@41.325,81.5 41.325,72.648 v1(42.452,71.52) ; v1(41.325,106.5) C47.1@41.375,106.55 ; v1(54.975,126.257) 54.975,126.725 57.25,129 C48.1@58.525,129 ; v1(58.525,106.5) v1(58.525,103.804) 58.525,102.996 61.325,100.196 v1(61.325,81.5) ; v1(59.928,58.592) 61.325,58.592 C7.1@61.325,58.5 v1(62.849,58.5) ; v1(69.681,13.227) 69.681,14.35 C50.2@69.825,14.35 ; v1(74.456,106.394) 77.919,106.394 C45.1@78.025,106.5 ; v1(75.549,13.862) 75.549,13.85 78.982,13.85 80.036,12.795 82.324,12.795 83.778,14.25 C53.2@86.902,14.25 ; v1(78.025,109.963) C45.1@78.025,106.5 ; v1(79.271,121.237) 79.628,121.237 v1(81.822,123.431) 81.822,127.028 81.325,127.525 C46.1@81.325,129 ; C53.2@86.925,14.25 C53.2@86.902,14.25 ; v1(87.817,111.043) 85.353,111.043 83.753,109.442 83.753,106.928 81.797,104.972 78.533,104.972 78.025,105.48 C45.1@78.025,106.5 ; DC9.A31@93.95,4.85 DC9.C31@93.95,9.85 92.562,11.238 88.539,11.238 86.902,12.874 C53.2@86.902,14.25 ; DC9.A32@96.45,4.85 DC9.C32@96.45,9.85 98.1,11.5 C49.2@98.1,12.525 ; v1(105.927,66.689) 106.238,67 C25.1@108.025,67 ; v1(110.071,113.229) 110.071,111.672 110.825,110.919 C12.1@110.825,108.5 C28.1@110.825,86 v1(110.825,84.373) ; v1(112.353,116.605) 111.325,117.633 C13.1@111.325,127 124.615,127 126.19,125.425 129.409,125.425 129.413,125.429 129.579,125.429 130.825,126.675 C14.1@130.825,127 v1(130.8,126.975) ; v1(113.242,9.796) 113.242,22.57 115.173,24.5 C17.1@118.525,24.5 ; C20.1@121.825,44.5 134.275,44.5 136,42.775 142.7,42.775 142.825,42.9 ; v1(128.975,66.825) 128.975,67.965 129.025,68.015 ; C27.1@129.025,67 129.025,68.015 ; v1(130.317,116.199) 130.24,116.122 130.24,111.943 130.825,111.358 C16.1@130.825,108.5 C11.1@148.025,108.5 ; C31.1@131.325,86 v1(131.325,84.373) 132.065,83.632 134.216,83.632 137.283,80.565 137.283,71.609 136.661,70.987 131.997,70.987 129.025,68.015 ; DC10.A1@133.95,4.85 v1(133.95,15.742) 140.025,21.817 C19.1@140.025,24.5 ; v1(145.094,67.304) 145.398,67 v1(147.329,67) C26.1@148.525,67 148.525,61.974 147.329,60.778 145.367,60.778 142.5,57.911 142.5,44.825 C23.1@142.825,44.5 142.825,42.9 ; v1(150.325,125.648) C15.1@150.325,127 ; C32.1@151.325,86 152.561,86 v1(154.189,84.373) ; v1(155.66,22.747) 157.413,24.5 C18.1@159.525,24.5 ; v1(162.175,44) 162.175,44.35 C24.1@162.325,44.5 162.325,46.3 ; v1(162.325,50.718) 162.325,46.3 ; C29.1@170.525,67 v1(170.525,68.498) ; C9.1@171.025,108.5 171.025,110.55 ; v1(173.8,126.95) 173.8,125.99 172.525,124.715 172.525,117.826 171.025,116.326 171.025,110.55 ; v1(173.825,84.373) v1(173.825,86) 173.825,87.15 174.175,87.5 191.55,87.5 192.525,86.525 C38.1@192.525,85.5 192.525,84.541 193.049,84.017 v1(203.646,84.017) ; C21.1@184.825,24.5 184.825,25.742 v1(187.969,28.886) ; C22.1@184.825,44.5 v1(184.825,50.718) ; v1(185.081,128.391) 195.02,128.391 195.325,128.086 C40.1@195.325,127 ; C39.1@192.525,107 192.525,108.417 190.442,110.5 171.075,110.5 171.025,110.55 ; C36.1@195.325,65.5 201.126,65.5 v1(201.634,64.992) ; DC10.A31@208.95,4.85 DC10.C31@208.95,9.85 ; C34.1@211.261,65.5 v1(211.825,65.5) ; DC10.A32@211.45,4.85 DC10.B32@211.45,7.35 ; DC10.C32@211.45,9.85 211.825,9.85 v1(211.825,62.021) v1(211.825,65.5) ; v1(211.82,81.502) 211.82,85.37 v1(211.825,85.375) 211.85,85.375 211.9,85.425 C37.1@211.825,85.5 C35.1@211.825,107 C33.1@211.825,127 ; C34.1@211.825,66.028 v1(211.825,65.5) ; 142.825,42.9 142.825,41.875 144.574,40.126 148.802,40.126 155.025,46.349 162.276,46.349 162.325,46.3
  Bottom Layer w0.4: v1(10.906,54.502) 10.906,53.769 11.65,53.025 17.05,53.025 17.8,53.775 v1(17.8,54.625) ; v1(10.975,10.475) 12.725,12.225 v1(13.45,12.225) ; DC9.C1@18.95,9.85 21.413,12.313 v1(33.105,12.313) 33.15,12.358 42.846,12.358 42.892,12.404 45.008,12.404 45.054,12.358 45.346,12.358 45.392,12.404 47.251,12.404 48.622,13.776 49.225,13.776 49.546,14.097 50.751,14.097 51.072,13.776 52.132,13.776 53.446,12.462 63.151,12.462 63.222,12.533 63.847,12.533 64.009,12.371 65.359,12.371 65.392,12.404 67.508,12.404 67.541,12.371 67.859,12.371 67.892,12.404 68.858,12.404 v1(69.681,13.227) 70.383,12.525 74.211,12.525 v1(75.549,13.862) ; v1(20.9,57.25) 39.575,57.25 v1(41.3,58.975) ; v1(21.269,72.943) 22.579,71.633 28.25,71.633 ; v1(41.325,106.5) 43.187,106.5 44.737,104.95 55.734,104.95 56.285,104.399 57.93,104.399 v1(58.525,103.804) ; v1(54.975,126.257) v1(38.515,126.257) 43.155,121.618 78.89,121.618 v1(79.271,121.237) ; v1(58.525,106.5) 74.351,106.5 v1(74.456,106.394) ; v1(59.928,58.592) 48.92,58.592 46.468,61.043 45.257,61.043 41.841,64.459 v1(41.325,64.459) 41.325,68.275 42.452,69.402 v1(42.452,71.52) 34.264,71.52 34.151,71.633 28.25,71.633 ; v1(62.849,58.5) 64.211,59.862 79.975,59.862 ; v1(78.025,109.963) 78.025,114.535 81.841,118.351 81.841,123.413 v1(81.822,123.431) ; v1(79.9,58.425) 79.9,59.787 79.975,59.862 ; v1(80.825,81.5) 79.888,81.5 78.888,82.5 62.256,82.5 61.325,81.569 v1(61.325,81.5) 59.227,81.5 59.225,81.502 36.702,81.502 28.3,73.1 28.3,71.683 28.25,71.633 ; v1(87.817,111.043) 87.817,111.347 88.084,111.614 88.084,111.653 88.955,112.525 98.758,112.525 99.521,111.762 102.187,111.762 103.654,113.229 v1(110.071,113.229) 110.071,114.323 v1(112.353,116.605) 112.353,116.538 112.692,116.199 v1(130.317,116.199) ; DC9.C31@93.95,9.85 DC9.C32@96.45,9.85 ; DC9.B32@96.45,7.35 99.725,10.625 102.968,10.625 103.743,9.85 ; v1(105.927,66.689) 101.414,66.689 94.587,59.862 79.975,59.862 ; v1(110.825,84.373) v1(131.325,84.373) v1(154.189,84.373) v1(173.825,84.373) ; v1(113.242,9.796) 103.797,9.796 103.743,9.85 ; v1(128.975,66.825) 128.975,67.974 129.676,68.675 143.722,68.675 v1(145.094,67.304) ; v1(130.8,126.975) 144.525,126.975 145.954,125.546 150.223,125.546 v1(150.325,125.648) 170.3,125.648 171.602,126.95 v1(173.8,126.95) 178.692,126.95 180.133,128.391 v1(185.081,128.391) ; DC10.C1@133.95,9.85 103.743,9.85 ; v1(133.95,15.742) 134.06,15.851 152.849,15.851 155.66,18.663 v1(155.66,22.747) ; v1(147.329,67) 148.092,66.237 156.168,66.237 157.929,67.998 170.025,67.998 v1(170.525,68.498) ; v1(162.175,44) 162.265,43.91 178.927,43.91 187.969,34.868 v1(187.969,28.886) ; v1(162.325,50.718) v1(184.825,50.718) ; v1(201.634,64.992) 201.634,63.316 203.9,61.05 210.854,61.05 v1(211.825,62.021) ; v1(203.646,84.017) 205.046,84.017 205.754,84.725 211.175,84.725 v1(211.825,85.375) ; DC10.A31@208.95,4.85 DC10.A32@211.45,4.85 ; DC10.C31@208.95,9.85 DC10.C32@211.45,9.85 ; v1(211.82,81.502) 211.825,81.497 v1(211.825,65.5)
  other v1: 20.85,81.425 131.375,86 151.3,86 20.8,106.516 148.099,108.6 111.345,126.994 38.475,128.925 81.325,128.925 20.8,128.975 58.475,129.025
"OC\"a\"": DC9.A13 DC9.B13 DC9.C13 U15.7 U15.8 | length 72.6
  Top Layer w0.4: v1(14.6,20.975) 14.625,21 U15.7@17.05,21 17.1,20.95 18.5,20.95 ; v1(18.5,18.625) 18.5,20.95 ; U15.8@27.725,20.95 18.5,20.95 ; DC9.A13@48.95,4.85 DC9.C13@48.95,9.85
  Bottom Layer w0.4: v1(18.5,18.625) 15.401,15.526 15.401,9.267 18.472,6.196 29.846,6.196 30.108,6.458 30.108,7.944 30.692,8.528 42.173,8.528 42.796,9.151 42.796,10.484 43.27,10.958 43.426,10.958 43.472,11.004 44.428,11.004 44.474,10.958 45.926,10.958 45.972,11.004 46.928,11.004 47.019,10.913 47.862,10.913 48.95,9.825 DC9.B13@48.95,7.35
"OC\"b\"": DC9.A14 DC9.B14 DC9.C14 U16.7 U16.8 | length 39.3
  Top Layer w0.4: DC9.A14@51.45,4.85 DC9.C14@51.45,9.85 51.459,9.85 52.9,11.291 59.21,11.291 62.737,14.817 62.737,15.308 v1(67.929,20.5) v1(70.125,20.5) ; v1(79.054,20.441) 79.063,20.45 U16.8@80.8,20.45
  Bottom Layer w0.4: v1(70.125,20.5) 71.754,20.5 72.085,20.169 78.782,20.169 v1(79.054,20.441)
u9.3: U1.5 U1.10 U5.5 U5.10 U9.3 | length 106.3
  Top Layer w0.4: U9.3@17.15,42.9 23.225,42.9 v1(23.325,43) ; U5.5@54.85,66.9 57.404,66.9 57.708,67.204 62.35,67.204 ; v1(65.566,57.982) 62.075,61.473 62.075,67.2 65.175,67.2 U5.10@65.525,66.85 65.575,66.9 U1.5@74.85,66.9 74.9,66.85 U1.10@85.525,66.85
  Bottom Layer w0.4: v1(23.325,43) 23.325,53.256 24.233,54.164 25.557,54.164 27.346,52.375 53.45,52.375 53.977,52.902 62.887,52.902 62.916,52.874 64.268,52.874 65.566,54.172 v1(65.566,57.982)
u9.5: U1.3 U1.12 U5.3 U5.12 U9.5 | length 119.7
  Top Layer w0.4: U9.5@17.15,40.4 v1(19.875,40.4) ; v1(54.85,69.4) 54.9,69.35 U5.12@65.525,69.35 65.575,69.4 U1.3@74.85,69.4 74.9,69.35 U1.12@85.525,69.35
  Bottom Layer w0.4: v1(19.875,40.4) 19.875,52.575 23.58,56.28 36.914,56.28 38.495,54.7 59.211,54.7 60.682,56.171 60.682,58.998 55.746,63.934 48.421,63.934 47.007,65.348 47.007,66.854 50.7,70.547 52.57,70.547 53.717,69.4 v1(54.85,69.4)
u9.10: U3.5 U3.10 U7.5 U7.10 U9.10 | length 63.8
  Top Layer w0.4: U3.5@14.35,66.9 14.4,66.85 22.7,66.85 ; v1(21.675,52.877) 22.7,53.901 22.7,66.85 ; v1(23.2,40.35) U9.10@27.825,40.35 ; U7.10@45.525,66.85 34.9,66.85 U7.5@34.85,66.9 25.075,66.9 U3.10@25.025,66.85 22.7,66.85
  Bottom Layer w0.4: v1(21.675,52.877) 21.212,52.413 21.212,42.338 v1(23.2,40.35)
u9.12: U3.3 U3.12 U7.3 U7.12 U9.12 | length 84.3
  Top Layer w0.4: U3.3@14.35,69.4 14.4,69.35 29.405,69.35 29.792,68.963 30.913,68.963 31.35,69.4 U7.3@34.85,69.4 34.9,69.35 47.442,69.35 49.355,67.437 49.355,47.841 v1(48.904,47.39) ; v1(25.968,43.834) 25.968,43.282 26.4,42.85 U9.12@27.825,42.85
  Bottom Layer w0.4: v1(25.968,43.834) 25.968,45.268 28.09,47.39 v1(48.904,47.39)
u10.3: U10.3 U18.5 U18.10 U22.5 U22.10 | length 296
  Top Layer w0.4: v1(30.743,34.69) 30.743,42.518 31.125,42.9 U10.3@33.225,42.9 ; U22.5@124.35,135.9 v1(126.679,135.9) 134.975,135.9 U22.10@135.025,135.85 144.3,135.85 U18.5@144.35,135.9 154.975,135.9 U18.10@155.025,135.85
  Bottom Layer w0.4: v1(30.743,34.69) 20.253,34.69 19.059,35.884 19.059,42.894 18.932,43.021 18.932,54.993 18.178,55.747 12.76,55.747 8.886,59.62 8.886,104.045 14.893,110.052 14.893,129.229 17.637,131.972 89.656,131.972 97.962,140.278 106.841,140.278 107.386,139.733 107.386,136.657 104.327,133.598 104.327,128.188 105.165,127.349 106.816,127.349 119.059,139.592 122.987,139.592 v1(126.679,135.9)
u10.5: U10.5 U18.3 U18.12 U22.3 U22.12 | length 294.2
  Top Layer w0.4: v1(16.75,48.025) 35.561,48.025 36.509,47.077 36.509,41.134 35.775,40.4 U10.5@33.225,40.4 ; U22.3@124.35,138.4 134.975,138.4 U22.12@135.025,138.35 ; v1(139.658,144.571) 139.658,140.558 137.487,138.387 135.062,138.387 U22.12@135.025,138.35 ; U18.12@155.025,138.35 154.975,138.4 U18.3@144.35,138.4 144.3,138.35 U22.12@135.025,138.35
  Bottom Layer w0.4: v1(16.75,48.025) 16.68,48.095 15.38,48.095 9.325,54.15 9.325,58.474 8.386,59.413 8.386,104.252 9.325,105.191 9.325,132.222 13.266,136.163 28.254,136.163 36.661,144.571 v1(139.658,144.571)
u10.10: U10.10 U20.5 U20.10 U24.5 U24.10 | length 330.4
  Top Layer w0.254: v1(100.847,145.561) 102.222,144.187 102.222,142.053 101.883,141.715 101.883,141.608 v1(101.45,141.175)
  Top Layer w0.4: v1(8.024,36.345) 8.252,36.573 8.252,100.259 8.9,100.907 v1(8.9,137.325) ; v1(33.435,33.725) 37.305,37.595 v1(37.375,37.595) ; v1(42.175,39.975) 42.37,39.975 42.376,39.969 42.757,40.35 U10.10@43.9,40.35 ; v1(108.086,135.909) 108.077,135.9 U24.5@104.35,135.9 108.085,135.861 109.079,135.85 119.736,135.85 v1(119.745,135.858) ; v1(161.794,135.858) 161.835,135.9 176.975,135.9 U20.10@177.025,135.85
  Bottom Layer w0.4: v1(8.024,36.345) 8.057,36.345 10.677,33.725 v1(33.435,33.725) ; v1(8.9,137.325) 22.241,137.325 22.336,137.23 30.667,145.561 v1(100.847,145.561) ; v1(37.375,37.595) 37.375,37.665 39.685,39.975 v1(42.175,39.975) ; v1(101.45,141.175) 107.55,141.175 108.086,140.639 v1(108.086,135.909) ; v1(119.745,135.858) 120.457,135.146 127.56,135.146 128.272,135.858 v1(161.794,135.858)
u10.12: U10.12 U20.3 U20.12 U24.3 U24.12 | length 223
  Top Layer w0.4: v1(42.376,43.148) 42.675,42.85 U10.12@43.9,42.85 ; v1(76.844,49.752) 81.086,53.994 v1(81.086,65.831) ; v1(94.341,69.743) v1(94.341,118.841) ; v1(104.325,138.425) 115,138.425 v1(115.075,138.35) ; U20.3@166.35,138.4 168.235,138.4 ; v1(169.425,139.575) 169.41,139.575 168.235,138.4 ; U20.12@177.025,138.35 176.975,138.4 168.235,138.4
  Bottom Layer w0.4: v1(42.376,43.148) 43.578,44.35 57.624,44.35 60.029,46.755 73.847,46.755 v1(76.844,49.752) ; v1(81.086,65.831) 90.204,65.831 v1(94.341,69.743) ; v1(94.341,118.841) 97.394,122.118 97.394,131.494 v1(104.325,138.425) ; v1(115.075,138.35) 115.987,138.35 118.1,140.464 168.536,140.464 v1(169.425,139.575)
u11.3: U11.3 U26.5 U26.10 U30.5 U30.10 | length 160.5
  Top Layer w0.254: U30.5@177.35,32.4 U30.5@177.4,32.35
  Top Layer w0.4: U11.3@34.85,25.9 v1(36.775,25.9) ; v1(135.475,32.4) 145.975,32.4 U26.10@146.025,32.35 147.755,32.35 148.023,32.082 149.107,32.082 149.531,32.506 149.531,32.624 150.812,33.906 152.186,33.906 152.748,33.344 v1(152.994,33.344) ; v1(174.707,33.344) 175.651,32.4 U30.5@177.35,32.4 ; U30.5@177.4,32.35 U30.10@188.025,32.35
  Bottom Layer w0.4: v1(36.775,25.9) 43.121,32.246 69.792,32.246 70.502,32.955 80.052,32.955 80.084,32.923 115.398,32.923 115.833,33.358 121.533,33.358 121.691,33.2 131.953,33.2 132.17,33.417 134.458,33.417 v1(135.475,32.4) ; v1(152.994,33.344) 166.052,33.344 168.532,35.824 172.228,35.824 v1(174.707,33.344)
u11.5: U11.5 U26.3 U26.12 U30.3 U30.12 | length 166
  Top Layer w0.254: U30.3@177.35,34.9 U30.3@177.4,34.85
  Top Layer w0.4: v1(132.927,32.658) 132.927,33.706 134.121,34.9 145.975,34.9 U26.12@146.025,34.85 149.275,34.85 151.495,37.07 v1(151.495,38.576) ; v1(172.125,37.791) 172.125,37.707 174.961,34.871 177.321,34.871 U30.3@177.35,34.9 ; U30.3@177.4,34.85 U30.12@188.025,34.85
  Bottom Layer w0.4: v1(34.475,23.375) 37.993,19.857 45.348,19.857 50.852,25.36 56.016,25.36 57.667,27.011 58.937,27.011 59.037,26.911 81.867,26.911 87.131,32.176 116.628,32.176 116.775,32.323 132.592,32.323 v1(132.927,32.658) ; v1(151.495,38.576) 151.646,38.425 171.491,38.425 v1(172.125,37.791)
u11.10: U11.10 U28.5 U28.10 U32.5 U32.10 | length 147.5
  Top Layer w0.4: U11.10@45.525,23.35 46.884,23.35 47.399,22.835 47.399,20.231 v1(46.974,19.806) ; U28.5@115.35,32.4 115.4,32.35 120.775,32.35 ; v1(118.314,29.483) 120.392,29.483 120.775,29.866 120.775,32.35 ; v1(123.555,29.305) 123.555,32.35 ; U28.10@126.025,32.35 123.555,32.35 ; v1(147.304,28.616) 147.945,29.257 151.012,32.93 152.172,32.93 152.702,32.4 157.243,32.4 157.605,32.762 160.277,32.762 160.689,32.35 U32.10@166.025,32.35 ; 120.775,32.35 123.555,32.35
  Bottom Layer w0.4: v1(46.974,19.806) 55.228,19.806 55.284,19.863 56.238,19.863 58.391,22.016 85.175,22.016 85.836,22.676 85.836,24.556 90.873,29.593 94.88,29.593 95.947,28.526 117.357,28.526 v1(118.314,29.483) ; v1(123.555,29.305) 124.458,28.402 133.6,28.402 134.503,29.305 146.615,29.305 v1(147.304,28.616)
u11.12: U11.12 U28.3 U28.12 U32.3 U32.12 | length 162.6
  Top Layer w0.4: U28.3@115.35,34.9 117.096,34.9 v1(117.103,34.893) 117.781,34.893 117.788,34.9 120.428,34.9 ; U28.12@126.025,34.85 125.975,34.9 120.428,34.9 ; U32.12@166.025,34.85 165.975,34.9 U32.3@155.35,34.9 154.162,34.9 153.704,35.358 153.704,38.653 152.968,39.389 143.214,39.389 140.528,42.075 130.581,42.075 129.846,42.81 128.338,42.81 120.428,34.9
  Bottom Layer w0.4: v1(45.525,25.85) 43.036,25.85 40.979,23.794 36.56,23.794 35.645,24.708 35.645,26.461 42.13,32.946 68.695,32.946 69.404,33.655 80.342,33.655 80.373,33.623 114.79,33.623 116.06,34.893 v1(117.103,34.893)